# Altium PCB pci-e.PcbDoc
Units mm, origin at the board's own origin, x right, y up, seen from the top; angles counter-clockwise.
Board outline 63 x 109.7 mm, 2 copper layers (Top Layer, Bottom Layer); 50 components, 31 nets, 306 pads, 0 vias.
Unrouted connection lines stored in the file: 156.
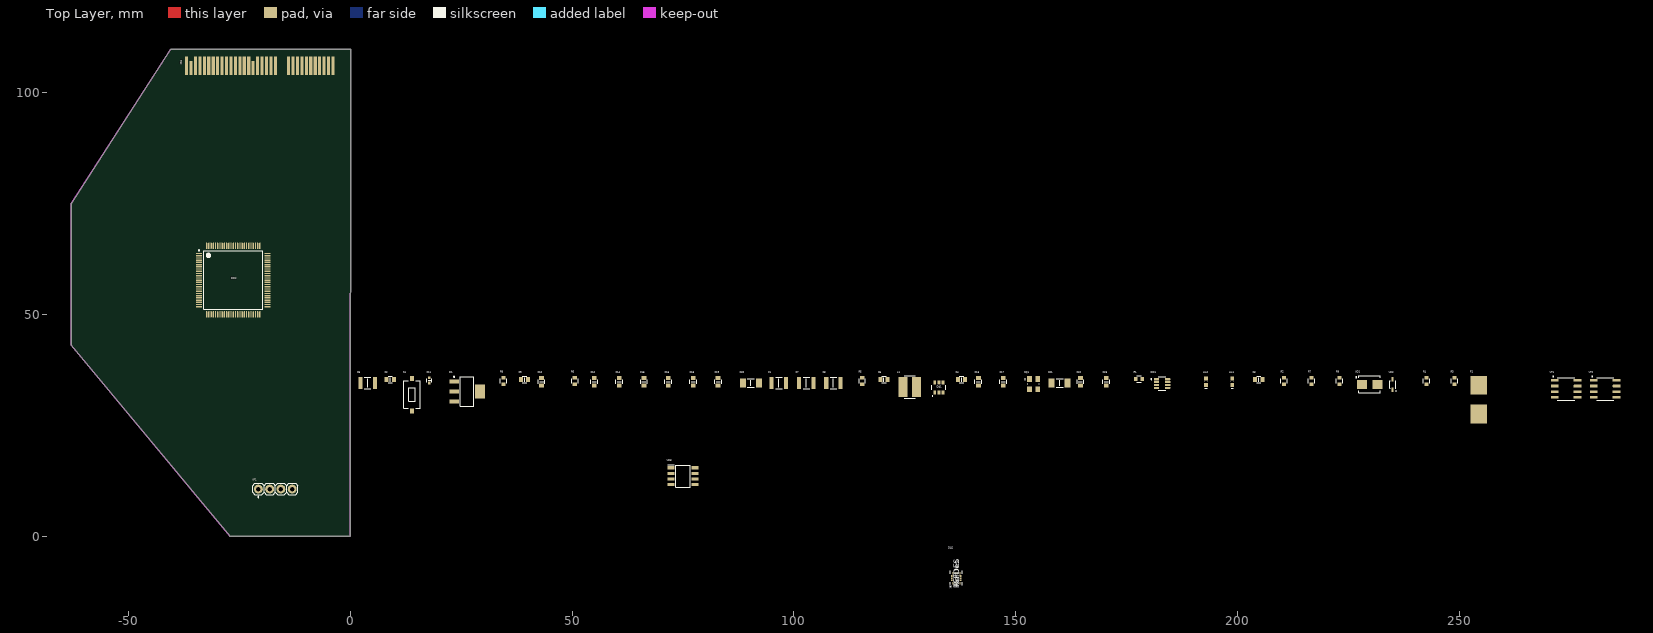
[diagram p0: Top Layer view]
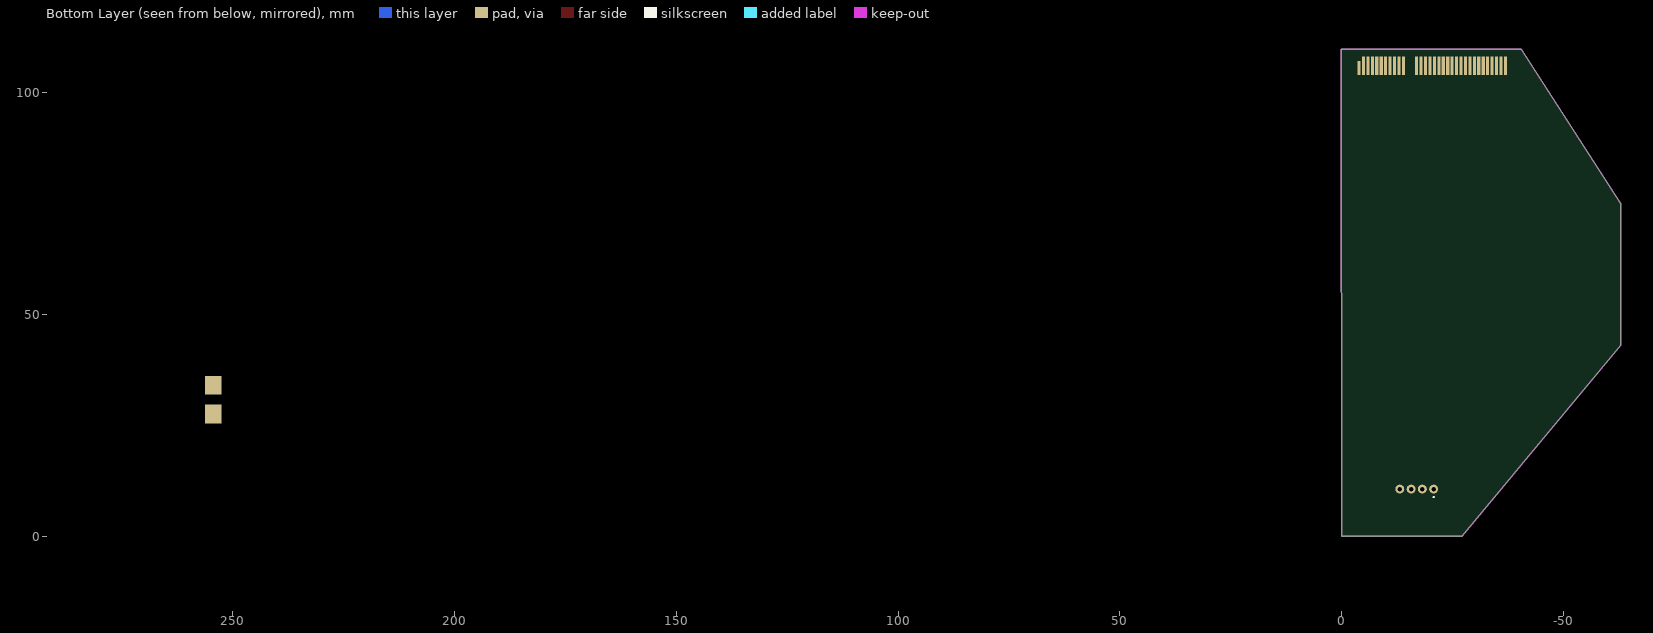
[diagram p1: Bottom Layer view, seen from below]

## Layer stack, top to bottom
Top Solder: solder mask 0.0102, Solder Resist, Dk 3.5
Top Layer: signal copper 0.0356
Dielectric 1: dielectric 0.32, FR-4, Dk 4.8
Bottom Layer: signal copper 0.0356
Bottom Solder: solder mask 0.0102, Solder Resist, Dk 3.5

## Board outline
-62.873,43 -27.149,0 0,0 0.127,109.7 -40.549,109.7 -62.873,75

## Design rules (kind name [scope] priority, off if disabled: settings)
Clearance [All] p1: gap=0.254 ignorepadtopadclearanceinfootprint=FALSE
DiffPairsRouting [All] p1: maxlimit=0.254 minlimit=0.254 mostfreqgap=0.254 toplayer_minwidth=0.381 toplayer_maxwidth=0.381 toplayer_prefwidth=0.381 bottomlayer_minwidth=0.381 bottomlayer_maxwidth=0.381 bottomlayer_prefwidth=0.381 maxuncoupledlength=12.7
PolygonConnect [All] p1: connectstyle=Relief reliefconductorwidth=0.254 reliefentries=4 polygonreliefangle="90 Angle" airgapwidth=0.254
RoutingVias [All] p1: holewidth=0.711 width=1.27 viastyle="Through Hole" minholewidth=0.711 minwidth=1.27 maxholewidth=0.711 maxwidth=1.27
SolderMaskExpansion [All] p1: expansion=0.102 istentingtop=FALSE
SupplyNets "Schematic Supply Nets_2" [InNet('GND')] p1: voltage=0.000
SupplyNets "Schematic Supply Nets_1" [InNet('VCC_LMR')] p2: voltage=0.000
SupplyNets "Schematic Supply Nets" [InNet('+3.3V_OUT')] p3: voltage=0.000
Width [All] p1: maxlimit=0.254 minlimit=0.254 preferedwidth=0.254
29 further rules are at their usual default settings.

## Classes and differential pairs
net class Power: +5V_OUT GND NetF1_1 NetVT2_5 VCC_LMR
differential pair CAN: +CAN_P -CAN_N

## Components (designator, comment, footprint, x,y, rotation, side; value= is the part's Value field where it differs from the comment)
C1 "Capacitor" 1210C 96.6,34.488 r0 top value="10 мк"
C2 "Capacitor" 0603C 9,35.288 r0 top value="0,1 мк"
C3 "Capacitor" 0603C 204.799,35.288 r0 top value="22 н"
C4 "Capacitor" 0603C 137.8,35.288 r0 top value="0,1 мк"
C5 "Capacitor" 0603C 120.3,35.288 r0 top value="100 п"
C6 "Capacitor" 1210C 3.9,34.488 r0 top value="10 мк"
C7 "Capacitor" 1210C 102.8,34.488 r0 top value="22 мк"
C8 "Capacitor" 1210C 108.9,34.488 r0 top value="22 мк"
C9 "Capacitor" 0603C 39.3,35.288 r0 top value="1 мк"
C10 "Capacitor" 0603C 43.1,34.788 r90 top value="0,1 мк"
C11 "Capacitor" 0402C 17.8,35.088 r90 top value="0,1 мк"
C12 "Capacitor" 0603C 55,34.788 r90 top value="0,1 мк"
C13 "Capacitor" 0603C 141.6,34.788 r90 top value="12 н"
C14 "Capacitor" 0603C 60.6,34.788 r90 top value="0,1 мк"
C15 "Capacitor" 0603C 66.2,34.788 r90 top value="0,1 мк"
C16 "Capacitor" 0603C 71.7,34.788 r90 top value="0,1 мк"
C17 "Capacitor" 0603C 147.2,34.788 r90 top value="12 н"
C18 "Capacitor" 0603C 77.3,34.788 r90 top value="0,1 мк"
C19 "Capacitor" 0603C 82.9,34.788 r90 top value="0,1 мк"
C20 "Capacitor" 1206C 90.3,34.488 r0 top value="4,7 мк"
C21 "Capacitor" 1206C 159.9,34.488 r0 top value="2,2 мк"
C22 "Capacitor" 0603C 164.6,34.788 r90 top value="0,1 мк"
C23 "Capacitor" 0603C 170.399,34.788 r90 top value="10 н"
D1 "LD1117S33CTR" SOT223 26.3,32.588 r0 top
DA1 "AP63200" TSOT26 132.7,33.488 r0 top
DA2 "ICM-42688-P" ICM-42688-P 136.611,-9.5 r90 top
DD1 "MAX3051EKA+T" SOT23-8 182.999,34.388 r0 top
DD2 "STM32F407VGT6" LQFP100 -26.4,57.7 r0 top
F1 "01543.15DR" 01543.15DR 254.399,27.488 r90 top value=3,15
HL1 "LED 0603 GREEN" 0603D_green 198.799,34.788 r90 top value=Зелёный
HL2 "LED 0603 YELLOW" 0603D_yellow 192.899,34.788 r90 top value={Цвет}
L1 "SP43-150K" SP43 126.1,33.588 r0 top value="15 мк"
R1 "Resistor" 0603R 177.799,35.388 r0 top value=120
R2 "Resistor" 0603R 210.499,34.988 r90 top value="100 к"
R3 "Resistor" 0603R 248.899,34.988 r90 top value="100 к"
R4 "Resistor" 0603R 242.599,34.988 r90 top value="10 к"
R5 "Resistor" 0603R 115.4,34.988 r90 top value="36 к"
R6 "Resistor" 0603R 50.6,34.988 r90 top value="6,8 к"
R7 "Resistor" 0603R 216.699,34.988 r90 top value="1,0 к"
R8 "Resistor" 0603R 34.5,34.988 r90 top value="10 к"
R9 "Resistor" 0603R 222.999,34.988 r90 top value="10 к"
S1 "TSS-TD-19XA-XTR" TSS-TD-19XA-XTR 13.9,31.888 r90 top
VD1 "SMBJ26CA" SMB 229.799,34.188 r0 top value="26 В"
VD2 "BZX384-C12" SOD-323 234.999,34.188 r90 top value="12 В"
VD3 "SP721" SP721 75,13.5 r0 top value=В
VT1 "UMW AO4485" SOP8 274.099,33.188 r0 top
VT2 "UMW AO4485" SOP8 282.899,33.188 r0 top
XP1 "PLS-4" PLS4-90 -20.74,10.6 r90 top
XS1 "PCI-E(4X)" PCIexpress_x4_full -3.089,103.844 r90 top
ZQ1 "XTAL_GND" QSMD3.2x2.5 153.1,35.388 r0 top value="8 МГц"

## Footprints (in the part's own frame and the unit in brackets; to place one, negate y for a bottom-side part, rotate by r counter-clockwise, add the part's x,y. Pads: shape width x height; smd on the part's side, far side on the other; paste and mask are expansions set on the pad)
0402C [mm]
  rect 0.635x0.61 smd: 1(-0.597,0) 2(0.597,0)
  silkscreen extent -0.38,-0.55 0.38,0.55, body extent -0.51,-0.25 0.51,0.25, height 0.71
0603C [mm] "Chip Resistor, 2-Leads, Body 1,40x0,80mm, IPC Medium Density"
  rect 0.9x1.05 smd: 1(-0.8,0) 2(0.8,0)
  silkscreen extent -0.5,-0.77 0.5,0.77, body extent -0.85,-0.45 0.85,0.45, height 0.9
0603D_green [mm]
  rect 0.91x0.83 smd: 1(0.75,0) 2(-0.75,0)
  silkscreen extent -1.45,-0.4 0.05,0.4, body extent -0.8,-0.41 0.8,0.41, height 0.71
0603D_yellow [mm]
  rect 0.91x0.83 smd: 1(0.75,0) 2(-0.75,0)
  silkscreen extent -1.45,-0.4 0.05,0.4, body extent -0.8,-0.41 0.8,0.41, height 0.71
0603R [mm] "Chip Resistor, 2-Leads, Body 1.60x0.85mm, IPC Medium Density"
  rect 0.8x0.95 smd: 1(-0.725,0) 2(0.725,0)
  silkscreen extent -0.5,-0.72 0.5,0.72, body extent -0.8,-0.4 0.8,0.4, height 0.45
1206C [mm]
  rect 1.4x2 smd paste+0: 1(-1.8,0) 2(1.8,0)
  silkscreen extent -0.77,-0.92 0.77,0.92, body extent -1.6,-0.74 1.6,0.86, height 1.59
1210C [mm]
  rect 0.954x2.706 smd paste+0: 1(-1.625,0) 2(1.625,0)
  silkscreen extent -0.75,-1.28 0.75,1.28, body extent -2.35,-1.6 2.35,1.6, height 0.25
01543.15DR [mm]
  rect 4.24x3.81 all layers, no hole: 1(0,0) 2(6.5,0)
ICM-42688-P [mil]
  rect 25x14 smd paste+0 mask+0: 1(-44.5,29.53) 2(-44.5,9.84) 3(-44.5,-9.84) 4(-44.5,-29.53) 8(44.5,-29.53) 9(44.5,-9.84) 10(44.5,9.84) 11(44.5,29.53)
  rect 14x25 smd paste+0 mask+0: 5(-19.68,-35) 6(0,-35) 7(19.69,-35) 12(19.69,35) 13(0,35) 14(-19.68,35)
  silkscreen extent -64,-54 77,54, body extent -59,-49 59,49, height 38
LQFP100 [mm] "TSQFP, 100-Leads, Body 14,00x14,00mm, Pitch 0,50mm, IPC Medium Density"
  oval 1.45x0.3 smd: 1(-7.725,6) 2(-7.725,5.5) 3(-7.725,5) 4(-7.725,4.5) 5(-7.725,4) 6(-7.725,3.5) 7(-7.725,3) 8(-7.725,2.5) 9(-7.725,2) 10(-7.725,1.5) 11(-7.725,1) 12(-7.725,0.5) 13(-7.725,0) 14(-7.725,-0.5) 15(-7.725,-1) 16(-7.725,-1.5) 17(-7.725,-2) 18(-7.725,-2.5) 19(-7.725,-3) 20(-7.725,-3.5) 21(-7.725,-4) 22(-7.725,-4.5) 23(-7.725,-5) 24(-7.725,-5.5) 25(-7.725,-6) 51(7.725,-6) 52(7.725,-5.5) 53(7.725,-5) 54(7.725,-4.5) 55(7.725,-4) 56(7.725,-3.5) 57(7.725,-3) 58(7.725,-2.5) 59(7.725,-2) 60(7.725,-1.5) 61(7.725,-1) 62(7.725,-0.5) 63(7.725,0) 64(7.725,0.5) 65(7.725,1) 66(7.725,1.5) 67(7.725,2) 68(7.725,2.5) 69(7.725,3) 70(7.725,3.5) 71(7.725,4) 72(7.725,4.5) 73(7.725,5) 74(7.725,5.5) 75(7.725,6)
  oval 0.3x1.45 smd: 26(-6,-7.725) 27(-5.5,-7.725) 28(-5,-7.725) 29(-4.5,-7.725) 30(-4,-7.725) 31(-3.5,-7.725) 32(-3,-7.725) 33(-2.5,-7.725) 34(-2,-7.725) 35(-1.5,-7.725) 36(-1,-7.725) 37(-0.5,-7.725) 38(0,-7.725) 39(0.5,-7.725) 40(1,-7.725) 41(1.5,-7.725) 42(2,-7.725) 43(2.5,-7.725) 44(3,-7.725) 45(3.5,-7.725) 46(4,-7.725) 47(4.5,-7.725) 48(5,-7.725) 49(5.5,-7.725) 50(6,-7.725) 76(6,7.725) 77(5.5,7.725) 78(5,7.725) 79(4.5,7.725) 80(4,7.725) 81(3.5,7.725) 82(3,7.725) 83(2.5,7.725) 84(2,7.725) 85(1.5,7.725) 86(1,7.725) 87(0.5,7.725) 88(0,7.725) 89(-0.5,7.725) 90(-1,7.725) 91(-1.5,7.725) 92(-2,7.725) 93(-2.5,7.725) 94(-3,7.725) 95(-3.5,7.725) 96(-4,7.725) 97(-4.5,7.725) 98(-5,7.725) 99(-5.5,7.725) 100(-6,7.725)
  silkscreen extent -7.85,-6.6 6.6,6.82, body extent -8,-8 8,8, height 1.6
PCIexpress_x4_full [mm]
  rect 3.2x0.7 smd far side paste-3.2 mask-3.2: A1(1.704,0.831)
  rect 4.2x0.7 smd far side paste-4.2 mask-4.2: A2(2.204,1.831) A3(2.204,2.831) A4(2.204,3.831) A5(2.204,4.831) A6(2.204,5.831) A7(2.204,6.831) A8(2.204,7.831) A9(2.204,8.831) A10(2.204,9.831) A11(2.204,10.831) A12(2.204,13.831) A13(2.204,14.831) A14(2.204,15.831) A15(2.204,16.831) A16(2.204,17.831) A17(2.204,18.831) A18(2.204,19.831) A19(2.204,20.831) A20(2.204,21.831) A21(2.204,22.831) A22(2.204,23.831) A23(2.204,24.831) A24(2.204,25.831) A25(2.204,26.831) A26(2.204,27.831) A27(2.204,28.831) A28(2.204,29.831) A29(2.204,30.831) A30(2.204,31.831) A31(2.204,32.831) A32(2.204,33.831)
  rect 4.2x0.7 smd paste-4.2 mask-4.2: B1(2.204,0.831) B2(2.204,1.831) B3(2.204,2.831) B4(2.204,3.831) B5(2.204,4.831) B6(2.204,5.831) B7(2.204,6.831) B8(2.204,7.831) B9(2.204,8.831) B10(2.204,9.831) B11(2.204,10.831) B12(2.204,13.831) B13(2.204,14.831) B14(2.204,15.831) B15(2.204,16.831) B16(2.204,17.831) B18(2.204,19.831) B19(2.204,20.831) B20(2.204,21.831) B21(2.204,22.831) B22(2.204,23.831) B23(2.204,24.831) B24(2.204,25.831) B25(2.204,26.831) B26(2.204,27.831) B27(2.204,28.831) B28(2.204,29.831) B29(2.204,30.831) B30(2.204,31.831) B32(2.204,33.831)
  rect 3.2x0.7 smd paste-3.2 mask-3.2: B17(1.704,18.831) B31(1.704,32.831)
PLS4-90 [mm]
  round 2 hole 1: 1(0,0) 2(0,-2.54) 3(0,-5.08) 4(0,-7.62)
  silkscreen extent -1.92,-8.89 1.27,1.27, body extent -10.04,-8.89 0.32,1.27, height 3.04
QSMD3.2x2.5 [mm] "Кварцевый резонатор"
  rect 1.05x1.3 smd: 1(0,0) 2(1.85,-2.3) 3(0,-2.3) 3(1.85,0)
  silkscreen extent -1.1,-1.18 2.18,0.1, body extent -0.32,-2.75 2.18,0.45, height 0.8
SMB [mm] "Diod"
  rect 2.25x2.1 smd: 1(1.725,0) 2(-1.725,0)
  silkscreen extent -3.17,-1.9 2.4,1.9, body extent -2.57,-1.9 2.57,1.9, height 2.4
SOD-323 [mm]
  rect 1.04x0.46 smd: 1(1.19,0) 2(-1.19,0)
  silkscreen extent -1.55,-0.8 0.85,0.65, body extent -1.25,-0.65 1.25,0.65, height 1.2
SOP8 [mm]
  rrect25% 1.76x0.6 smd: 1(-2.58,1.905) 2(-2.58,0.635) 3(-2.58,-0.635) 4(-2.58,-1.905) 5(2.58,-1.905) 6(2.58,-0.635) 7(2.58,0.635) 8(2.58,1.905)
  silkscreen extent -3.02,-2.52 1.95,2.89, body extent -3,-2.42 3,2.42, height 2.1
SOT23-8 [mm]
  rrect50% 1.21x0.48 smd paste+0 mask+0.102: 1(-1.255,0.975) 2(-1.255,0.325) 3(-1.255,-0.325) 4(-1.255,-0.975) 5(1.255,-0.975) 6(1.255,-0.325) 7(1.255,0.325) 8(1.255,0.975)
  silkscreen extent -2.5,-1.54 0.88,1.54, body extent -1.4,-1.45 1.4,1.45, height 1.45
SOT223 [mm] "SOT223, ld1117"
  rect 2.15x0.9 smd: 1(-2.925,2.3) 2(-2.925,0) 3(-2.925,-2.3)
  rect 2.15x3.25 smd: 2(2.925,0)
  silkscreen extent -3.05,-3.35 1.55,3.42, body extent -3.56,-3.3 3.51,3.2, height 1.6
SP43 [mm]
  rect 2x4.5 smd: 1(-1.5,0) 2(1.5,0)
  silkscreen extent -1.2,-2.5 1.3,2.5, body extent -2,-2.22 2,2.22, height 3.19
SP721 [mm]
  rect 1.525x0.7 smd: 1(-2.712,1.905) 2(-2.712,0.635) 3(-2.712,-0.635) 4(-2.712,-1.905) 5(2.712,-1.905) 6(2.712,-0.635) 7(2.712,0.635) 8(2.712,1.905)
  silkscreen extent -3.47,-2.45 1.6,2.61
TSOT26 [mm]
  rect 0.645x0.9 smd: 1(-0.95,-1.15) 2(0,-1.15) 3(0.95,-1.15) 4(0.95,1.15) 5(0,1.15) 6(-0.95,1.15)
  silkscreen extent -1.58,-1.95 1.57,0.5, body extent -1.5,-1.4 1.5,1.4, height 1.01
TSS-TD-19XA-XTR [mm]
  rect 1.1x1 smd: 1(-3.65,0) 2(3.65,0)
  silkscreen extent -3.1,-1.9 3.1,1.9, body extent -4.05,-1.85 4.05,1.85, height 2.55

## Part data
C1 C6: library part Capacitor_10u_10_35V_X7R_1210C, "Конденсатор 1210C ёмкостью 10 мк 10%, 35 В, X7R", Capacity (nF)=10000, Dielectric=X7R, Tolerance=10%, Voltage (V)=35, Part Number=Capacitor_10u_10_35V_X7R_1210C
  C1: Library Path2=Schematic\Capacitor.SchLib
C2 C4 C10 C12 C14 C15 C16 C18 C19 C22: library part Capacitor_0,1u_10_50V_X7R_0603C, "Конденсатор 0603C ёмкостью 0,1 мк 10%, 50 В, X7R", Capacity (nF)=100, Dielectric=X7R, Tolerance=10%, Voltage (V)=50, Part Number=Capacitor_0,1u_10_50V_X7R_0603C
  C4: Library Path2=Schematic\Capacitor.SchLib
C3: library part Capacitor_22n_10_50V_X7R_0603C, "Конденсатор 0603C ёмкостью 22 н 10%, 50 В, X7R", Capacity (nF)=22, Dielectric=X7R, Tolerance=10%, Voltage (V)=50, Part Number=Capacitor_22n_10_50V_X7R_0603C
C5: library part Capacitor_100p_10_50V_X7R_0603C, "Конденсатор 0603C ёмкостью 100 п 10%, 50 В, X7R", Capacity (nF)=0,1, Dielectric=X7R, Tolerance=10%, Voltage (V)=50, Library Path2=Schematic\Capacitor.SchLib, Part Number=Capacitor_100p_10_50V_X7R_0603C
C7 C8: library part Capacitor_22u_10_25V_X7R_1210C, "Конденсатор 1210C ёмкостью 22 мк 10%, 25 В, X7R", Capacity (nF)=22000, Dielectric=X7R, Tolerance=10%, Voltage (V)=25, Library Path2=Schematic\Capacitor.SchLib, Part Number=Capacitor_22u_10_25V_X7R_1210C
C9: library part Capacitor_1u_10_25V_X7R_0603C, "Конденсатор 0603C ёмкостью 1 мк 10%, 25 В, X7R", Capacity (nF)=1000, Dielectric=X7R, Tolerance=10%, Voltage (V)=25, Part Number=Capacitor_1u_10_25V_X7R_0603C
C11: library part Capacitor_0,1u_10_16V_X7R_0603C, "Конденсатор 0402C ёмкостью 0,1 мк 10%, 16 В, X7R", Capacity (nF)=100, Dielectric=X7R, Tolerance=10%, Voltage (V)=16, Part Number=Capacitor_0,1u_10_16V_X7R_0603C, Автор=rreali
C13 C17: library part Capacitor_12n_10_50V_X7R_0603C, "Конденсатор 0603C ёмкостью 12 н 10%, 50 В, X7R", Capacity (nF)=12, Dielectric=X7R, Tolerance=10%, Voltage (V)=50, Part Number=Capacitor_12n_10_50V_X7R_0603C
C20: library part Capacitor_4,7u_10_50V_X7R_1206C, "Конденсатор 1206C ёмкостью 4,7 мк 10%, 50 В, X7R", Capacity (nF)=4700, Dielectric=X7R, Tolerance=10%, Voltage (V)=50, Part Number=Capacitor_4,7u_10_50V_X7R_1206C
C21: library part Capacitor_2,2u_10_50V_X7R_1206C, "Конденсатор 1206C ёмкостью 2,2 мк 10%, 50 В, X7R", Capacity (nF)=2200, Dielectric=X7R, Tolerance=10%, Voltage (V)=50, Part Number=Capacitor_2,2u_10_50V_X7R_1206C
C23: library part Capacitor_10n_10_50V_X7R_0603C, "Конденсатор 0603C ёмкостью 10 н 10%, 50 В, X7R", Capacity (nF)=10, Dielectric=X7R, Tolerance=10%, Voltage (V)=50, Part Number=Capacitor_10n_10_50V_X7R_0603C
D1: "Линейный стабилизатор напряжения", Part Number=LD1117S33CTR
DA1: "DC-DC понижающий преобразователь, Vin: 3.8 - 40 В, adj, 2 А", Part Number=AP63200
DA2: "Датчик положения ICM-42688-P", Part Number=ICM-42688-P
DD1: "CAN трансивер 1Mbps +3.3В", Datasheet=https://static.chipdip.ru/lib/876/DOC015876362.pdf, Part Number=MAX3051EKA+T, Автор=glebmih
DD2: "Микроконтроллер", Part Number=STM32F407VGT6
F1: "01543.15DR, SMD Предохранитель + Держатель Очень быстродействующий 3,15А (8051399152)", Datasheet=https://static.chipdip.ru/lib/754/DOC031754012.pdf, Part Number=01543.15DR, Автор=FedorPOU
HL1: "Светодиод 0603 Зелёный", Part Number="LED 0603 GREEN"
HL2: "Светодиод 0603 Жёлтый", Part Number="LED 0603 YELLOW"
L1: "Индуктивность на 15 мкГн, номинальный ток 1,3 А", Current (A)=1,3, Inductance (μH)=15, Part Number=SP43-150K
R1: library part RC0603FR-07120RL, "Резистор номиналом 120 Ом 1% 0603", Tolerance=1%, Part Number=RC0603FR-07120RL
R2 R3: library part RC0603FR-07100KL, "Резистор номиналом 100 к Ом 1% 0603", Tolerance=1%, Part Number=RC0603FR-07100KL
R4 R8 R9: library part RC0603FR-0710KL, "Резистор номиналом 10 к Ом 1% 0603", Tolerance=1%, Part Number=RC0603FR-0710KL
R5: library part RC0603FR-0736KL, "Резистор номиналом 36 к Ом 1% 0603", Tolerance=1%, Part Number=RC0603FR-0736KL
R6: library part RC0603FR-076K8L, "Резистор номиналом 6,8 к Ом 1% 0603", Tolerance=1%, Part Number=RC0603FR-076K8L
R7: library part RC0603FR-071KL, "Резистор номиналом 1,0 к Ом 1% 0603", Tolerance=1%, Part Number=RC0603FR-071KL
S1: "Тактовая кнопка", Part Number=TSS-TD-19XA-XTR
VD1: "Двунаправленный защитный диод на 26 В, рассеиваемая мощность 600 Вт", Power (W)=600, Voltage (V)=26, Part Number=SMBJ26CA, Автор=FedorPOU
VD2: "Стабилитрон на 12 В, рассеиваемая мощность 0.3 Вт", Current="5 мА", Power (W)=0.3, Voltage (V)=12, Accuracy=0,05, Part Number=BZX384-C12
VD3: "SP721ABG, ESD Protection Diodes / TVS Diodes 6 CH DIODE ARRAY, SP721ABG, 8004597169", Part Number=SP721, Автор=FedorPOU
VT1 VT2: "P-канальный MOSFET", Part Number="UMW AO4485", Автор=FedorPOU
XP1: library part PLS4-90, "Гребенка 4 пина", Value1=3.3V, Value2=SWDIO, Value3=SWCLK, Value4=GND, Part Number=PLS4-90, System=Connector, Автор=FedorPOU
ZQ1: "Кварцевый резонатор с входом земли", Part Number=XTAL_GND
XS1: Part Number=PCI-E(4X)

## Nets (pads, with @x,y where several pads share a name; then routed paths per layer and width w, separated by ;. In a path a pad name is that pad's centre, name@x,y a point inside that pad or via, vN(x,y) a via of type N, cw(c..) or ccw(c..) an arc to the next point about the centre after c; other vN are vias at no path point)
+3.3V_OUT: C6.2 C9.2 C10.2 C12.2 C14.2 C15.2 C16.2 C18.2 C19.2 C20.2 C21.2 C22.2 C23.2 D1.2 DA2.5 DA2.8 DD1.3 DD2.6 DD2.11 DD2.19 DD2.21 DD2.22 DD2.28 DD2.50 DD2.75 DD2.100 R8.1 VD3.8 VT2.1 VT2.2 VT2.3
+5V_OUT: C2.2 C5.2 C7.2 C8.2 D1.3 L1.2 R5.2
ad0: DA2.1 DD2.53
BST: C4.1 DA1.6
CAN_N: DD1.6 R1.1 VD3.6 XS1.B6
CAN_P: DD1.7 R1.2 VD3.5 XS1.B5
cs: DA2.12 DD2.51
FB: C5.1 DA1.1 R5.1 R6.2
GND: C1.1 C2.1 C6.1 C7.1 C8.1 C9.1 C10.1 C11.1 C12.1 C13.1 C14.1 C15.1 C16.1 C17.1 C18.1 C19.1 C20.1 C21.1 C22.1 C23.1 D1.1 DA1.4 DA2.2 DA2.3 DA2.6 DA2.7 DA2.10 DA2.11 DD1.2 DD1.5 DD1.8 DD2.10 DD2.20 DD2.27 DD2.74 DD2.99 HL1.2 HL2.2 R2.1 R6.1 R9.2 S1.2 VD1.1 VD3.4 XP1.4 XS1.A15 XS1.A20 XS1.A23 XS1.A24 XS1.A27 XS1.A28 XS1.A31 XS1.B4 XS1.B7 XS1.B13 XS1.B16 XS1.B18 ZQ1.3
int1: DA2.4 DD2.55
NC: DA2.9 DD2.61
NetC3_1: C3.1 R2.2 R3.2 VD2.1 VT1.4
NetC13_2: C13.2 DD2.13 ZQ1.1
NetC17_2: C17.2 DD2.12 ZQ1.2
NetDD2_81: DD2.81 R7.2
NetF1_1: F1.1 XS1.A2 XS1.A3
NetF1_2: F1.2 VD1.2 VT1.5 VT1.6 VT1.7 VT1.8
NetHL1_1: HL1.1 R4.1
NetHL2_1: HL2.1 R7.1
NetR9_1: R9.1 VT2.4
NetVT2_5: VT2.5 VT2.6 VT2.7 VT2.8 XP1.1
NetXS1_B1: XS1.B1 XS1.B2 XS1.B3
RST: C11.2 DD2.14 R8.2 S1.1
RX: DD1.4 DD2.95 VD3.2
scl: DA2.13 DD2.52
sda: DA2.14 DD2.54
SW: C4.2 DA1.5 L1.1
SWCLK: DD2.76 XP1.3
SWDIO: DD2.72 XP1.2
TX: DD1.1 DD2.96 VD3.1
VCC_LMR: C1.2 C3.2 DA1.2 DA1.3 R3.1 R4.2 VD2.2 VT1.1 VT1.2 VT1.3
pads on no net: DD2.1 DD2.2 DD2.3 DD2.4 DD2.5 DD2.7 DD2.8 DD2.9 DD2.15 DD2.16 DD2.17 DD2.18 DD2.23 DD2.24 DD2.25 DD2.26 DD2.29 DD2.30 DD2.31 DD2.32 DD2.33 DD2.34 DD2.35 DD2.36 DD2.37 DD2.38 DD2.39 DD2.40 DD2.41 DD2.42 DD2.43 DD2.44 DD2.45 DD2.46 DD2.47 DD2.48 DD2.49 DD2.56 DD2.57 DD2.58 DD2.59 DD2.60 DD2.62 DD2.63 DD2.64 DD2.65 DD2.66 DD2.67 DD2.68 DD2.69 DD2.70 DD2.71 DD2.73 DD2.77 DD2.78 DD2.79 DD2.80 DD2.82 DD2.83 DD2.84 DD2.85 DD2.86 DD2.87 DD2.88 DD2.89 DD2.90 DD2.91 DD2.92 DD2.93 DD2.94 DD2.97 DD2.98 VD3.3 VD3.7 XS1.A1 XS1.A4 XS1.A5 XS1.A6 XS1.A7 XS1.A8 XS1.A9 XS1.A10 XS1.A11 XS1.A12 XS1.A13 XS1.A14 XS1.A16 XS1.A17 XS1.A18 XS1.A19 XS1.A21 XS1.A22 XS1.A25 XS1.A26 XS1.A29 XS1.A30 XS1.A32 XS1.B8 XS1.B9 XS1.B10 XS1.B11 XS1.B12 XS1.B14 XS1.B15 XS1.B17 XS1.B19 XS1.B20 XS1.B21 XS1.B22 XS1.B23 XS1.B24 XS1.B25 XS1.B26 XS1.B27 XS1.B28 XS1.B29 XS1.B30 XS1.B31 XS1.B32

## Keep-outs
Keep-Out Layer:
  the board outline again, w0.2

## Silkscreen, mask and mechanical layers (free items; w line width, h text height)
Mechanical 1:
  circle w0: c-182.843,84.755 r0
Mechanical 7:
  the board outline again, w0.2

## Text inside footprints (layer, text, board x,y; h text height)
DA2: Mechanical 13 "RefDes2" at 137.246,-11.723 h1.27 r90; Mechanical 13 "*" at 136.246,-10.63 h1.27 r90; Top Overlay "REFDES" at 137.246,-11.723 h1.27 r90; Top Overlay "RefDes" at 137.246,-11.405 h1.27 r90; Top Overlay "*" at 136.246,-11.9 h1.27 r90